# Altium PCB PCB_Sonography-v1.0.PcbDoc (part 3 of 3)
Units mil, origin at the board's own origin, x right, y up, seen from the top; angles counter-clockwise.
Board outline 1550.13 x 1118 mil, 4 copper layers (Top Layer, GND/Signal, PWR/Signal, Bottom Layer), stack 62.449 mil thick; 109 components, 55 nets, 355 pads, 157 vias.
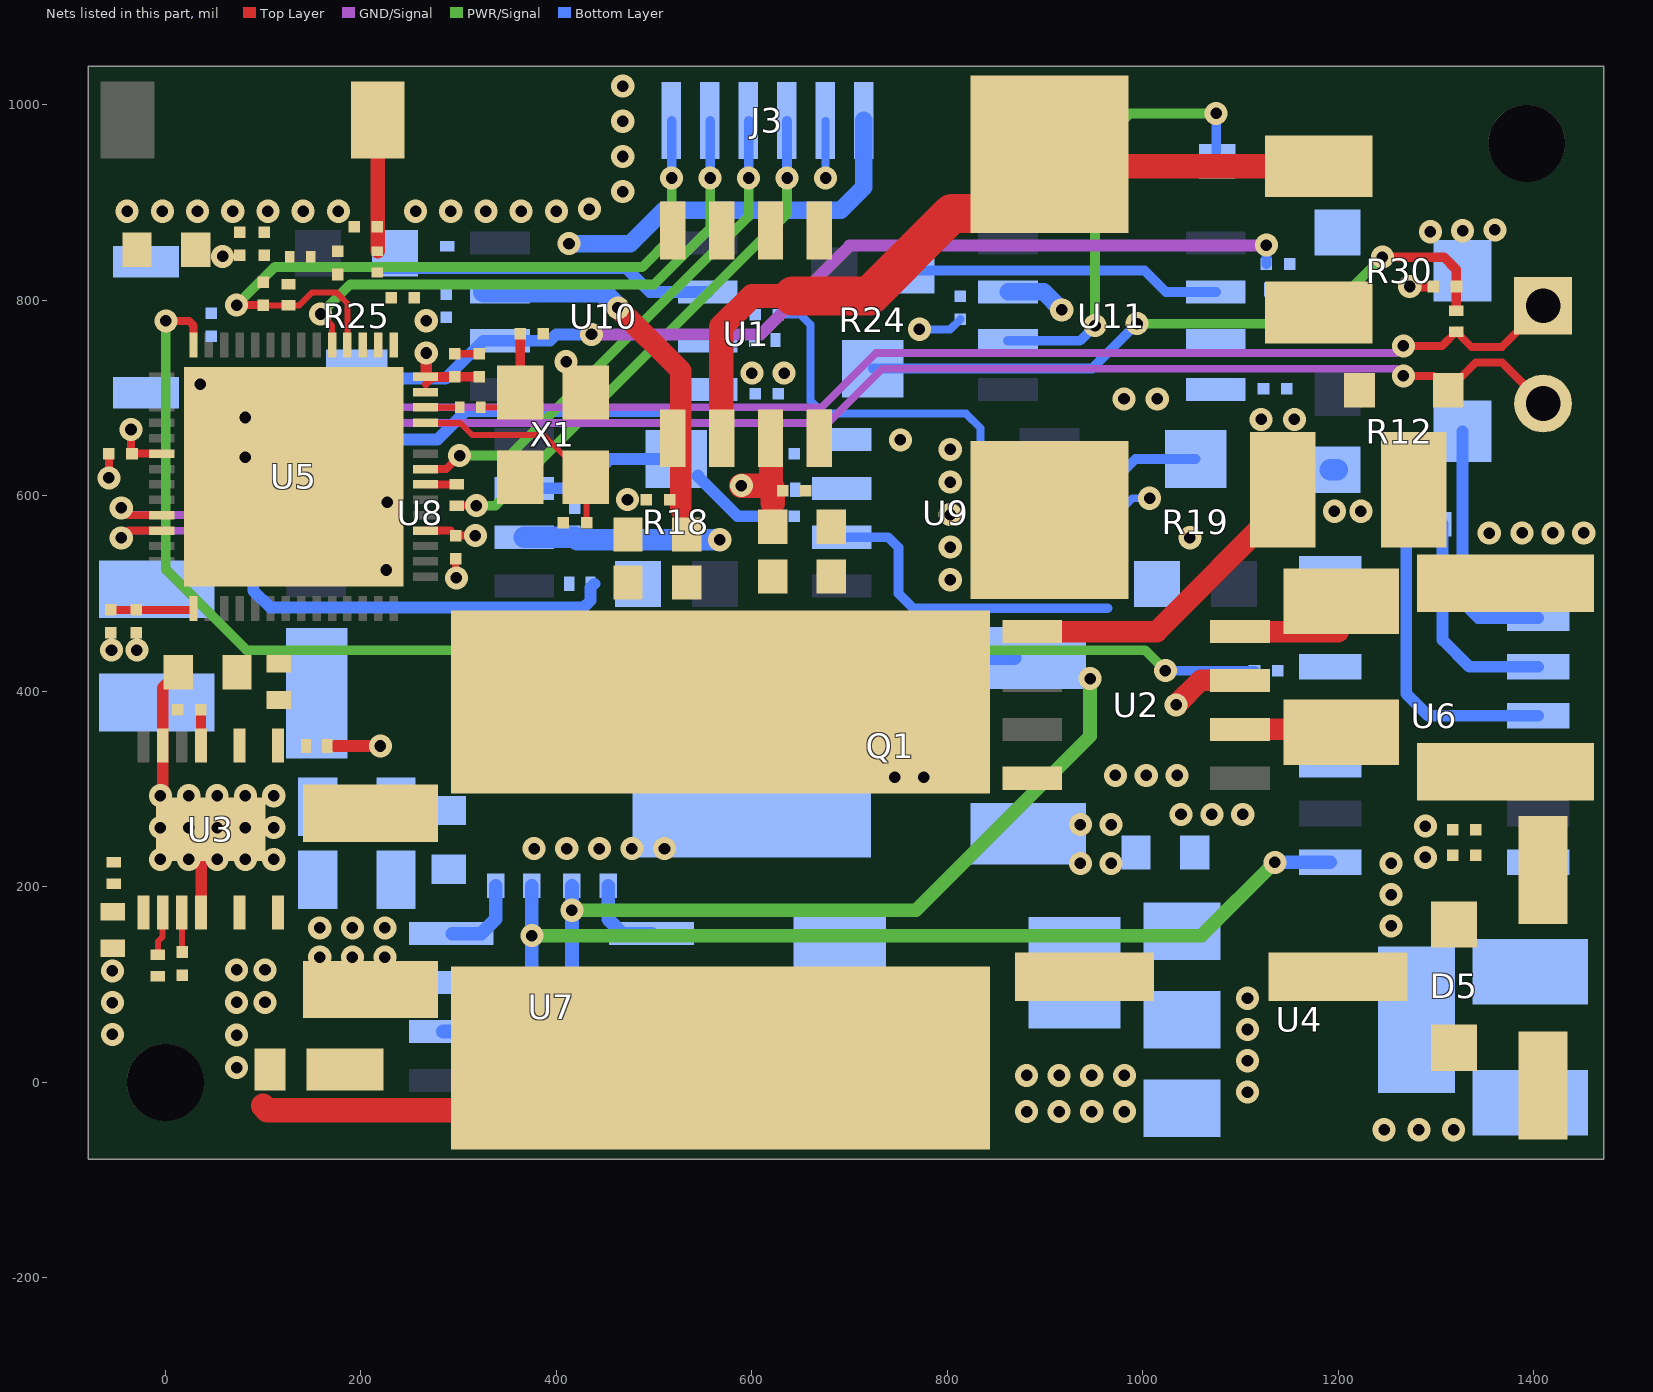
[diagram p4: the nets of this part, all layers, seen from the top]

## Part data (continued)
SW2: "SWITCH TACTILE SPST-NO 0.05A 12V", Contact Current Rating=50mA, Contact Resistance=100mR, Insulation Resistance=100MR, LCSC Part Number=C231329, Manufacturer=Omron, Max Operating Temperature=70°C, Max Voltage Rating (DC)=12V, Min Operating Temperature=-25°C, Operating Force=1.5N, Package Quantity=1, Ratings="Dust Proof,IP40", Supplier Part Number 1=SW1020DKR-ND, Actuator Length=0.4mm, Actuator Type=Standard, ComponentLink1Description=http://www.farnell.com/datasheets/60838.pdf?src-supplier=Farnell, ComponentLink1URL=http://www.farnell.com/datasheets/60838.pdf?src-supplier=Farnell, ComponentLink2Description=http://www.farnell.com/datasheets/60838.pdf?src-supplier=Element14, ComponentLink2URL=http://www.farnell.com/datasheets/60838.pdf?src-supplier=Element14, ComponentLink3Description=https://omronfs.omron.com/en_US/ecb/products/pdf/en-b3u.pdf?src-supplier=Digi-Key, ComponentLink3URL=https://omronfs.omron.com/en_US/ecb/products/pdf/en-b3u.pdf?src-supplier=Digi-Key, ComponentLink4Description=http://www.omron.com/ecb/products/pdf/en-b3u.pdf?src-supplier=Digi-Key, ComponentLink4URL=http://www.omron.com/ecb/products/pdf/en-b3u.pdf?src-supplier=Digi-Key, ComponentLink5Description=https://www.distrelec.biz/Web/Downloads/he/et/B3U_eng_datasheet.pdf?mime=application%2Fpdf&src-supplier=Distrelec, ComponentLink5URL=https://www.distrelec.biz/Web/Downloads/he/et/B3U_eng_datasheet.pdf?mime=application%2Fpdf&src-supplier=Distrelec, ComponentLink6Description=http://www.onlinecomponents.com/productFiles/mf-OM/en-b3u.pdf?src-supplier=Onlinecomponents.com, ComponentLink6URL=http://www.onlinecomponents.com/productFiles/mf-OM/en-b3u.pdf?src-supplier=Onlinecomponents.com, ComponentLink7Description=https://www.verical.com/server-webapp/html/getDatasheet?partID=552554&src-supplier=Verical, ComponentLink7URL=https://www.verical.com/server-webapp/html/getDatasheet?partID=552554&src-supplier=Verical, ComponentLink8Description=http://www.farnell.com/datasheets/1685550.pdf?src-supplier=Element14, ComponentLink8URL=http://www.farnell.com/datasheets/1685550.pdf?src-supplier=Element14, ComponentLink9Description=http://www.farnell.com/datasheets/2610940.pdf?src-supplier=Farnell, ComponentLink9URL=http://www.farnell.com/datasheets/2610940.pdf?src-supplier=Farnell, ComponentLink10Description=https://www.alliedelec.com/m/d/4c8a9ef82804fc3c241a13c1e298fd73.pdf?src-supplier=Allied+Electronics, ComponentLink10URL=https://www.alliedelec.com/m/d/4c8a9ef82804fc3c241a13c1e298fd73.pdf?src-supplier=Allied+Electronics, Contact Material=Silver, Current Rating=50mA, Depth=2.5mm, Electrical Life=200000Cycles, Height=1.2mm, Illumination Type=Non-Illuminated,Illuminated, Item Type=Switch, Lead Free="Lead Free", Length=4mm, Manufacturer Part Number=B3U-1000P, Max Current Rating=50mA, Mechanical Life=200000Cycles, Mount="Surface Mount", Orientation=Straight, Packaging="Tape and Reel", Pricing 1="1=1, 10=0.961, 25=0.9064, 50=0.7976, 100=0.7251, 250=0.68888, 500=0.67074, 1000=0.52571 (USD)", REACH SVHC=Unknown, Stock 1=116454, Supplier 1=Digi-Key, Switch Function=Off-Mom, Switch Travel=0.15mm, Termination=SMD/SMT, Throw Configuration=SPST, Voltage Rating (DC)=12V, Weight=0.000776oz, Width=3mm
U1: "IC REG BUCK 3.3V 2A 8SOIC", LCSC Part no=C151823, Manufacturer=Diodes, Supplier Part Number=AP1509-33SGDICT-ND, Category="Voltage Regulators - Switching", ComponentLink1Description=https://datasheet.ciiva.com/2024/ap1509-2024112.pdf?src-supplier=Digi-Key, ComponentLink1URL=https://datasheet.ciiva.com/2024/ap1509-2024112.pdf?src-supplier=Digi-Key, ComponentLink2Description=https://datasheet.ciiva.com/22696/608784-22696879.pdf?src-supplier=Element14, ComponentLink2URL=https://datasheet.ciiva.com/22696/608784-22696879.pdf?src-supplier=Element14, ComponentLink3Description=https://datasheet.ciiva.com/3220/ap1509-3220415.pdf?src-supplier=Avnet, ComponentLink3URL=https://datasheet.ciiva.com/3220/ap1509-3220415.pdf?src-supplier=Avnet, ComponentLink4Description=https://datasheet.ciiva.com/3222/ap1509-3222047.pdf?src-supplier=Avnet, ComponentLink4URL=https://datasheet.ciiva.com/3222/ap1509-3222047.pdf?src-supplier=Avnet, ComponentLink5Description=https://datasheet.ciiva.com/1161/608784-1161659.pdf?src-supplier=Element14, ComponentLink5URL=https://datasheet.ciiva.com/1161/608784-1161659.pdf?src-supplier=Element14, Item Type=Regulator, Manufacturer Part Number=AP1509-33SG-13, Pricing="1=1.6, 10=1.43, 25=1.3576, 100=1.115, 250=1.04232, 500=0.92112, 1000=0.7272 (USD)", RoHS=Yes, Stock=7160, Supplier=Digi-Key
U2: "Charge Pump INV/STPUP/STPDN -1.5V to -10V 100mA 8-Pin SOIC T/R / IC REG SWITCHD CAP INV 8SOIC", LCSC Part Number=C130206, Manufacturer="Texas Instruments", Supplier Part Number=296-21856-1-ND, Category="Voltage Regulators - Switching", ComponentLink1Description=https://datasheet.ciiva.com/15114/getdatasheetpartid-314156-15114111.pdf?src-supplier=Verical, ComponentLink1URL=https://datasheet.ciiva.com/15114/getdatasheetpartid-314156-15114111.pdf?src-supplier=Verical, ComponentLink2Description=https://datasheet.ciiva.com/2033/tl7660-2033856.pdf?src-supplier=Digi-Key, ComponentLink2URL=https://datasheet.ciiva.com/2033/tl7660-2033856.pdf?src-supplier=Digi-Key, ComponentLink3Description=https://datasheet.ciiva.com/41462/001014582-da-01-en-ic-reg-multi-config-tl7660cdr-soic-8-tid-41462430.pdf?src-supplier=Conrad, ComponentLink3URL=https://datasheet.ciiva.com/41462/001014582-da-01-en-ic-reg-multi-config-tl7660cdr-soic-8-tid-41462430.pdf?src-supplier=Conrad, ComponentLink4Description=https://datasheet.ciiva.com/3216/tl7660-3216343.pdf?src-supplier=Avnet, ComponentLink4URL=https://datasheet.ciiva.com/3216/tl7660-3216343.pdf?src-supplier=Avnet, ComponentLink5Description=https://datasheet.ciiva.com/2033/tl7660-2033857.pdf?src-supplier=Digi-Key, ComponentLink5URL=https://datasheet.ciiva.com/2033/tl7660-2033857.pdf?src-supplier=Digi-Key, ComponentLink6Description=https://datasheet.ciiva.com/2033/tl7660-2033858.pdf?src-supplier=Digi-Key, ComponentLink6URL=https://datasheet.ciiva.com/2033/tl7660-2033858.pdf?src-supplier=Digi-Key, Item Type=IC, Manufacturer Part Number=TL7660CDR, Pricing="1=1.15, 10=1.024, 25=0.9716, 100=0.798, 250=0.746, 500=0.65926, 1000=0.52046 (USD)", RoHS=Yes, Stock=5011, Supplier=Digi-Key
U3: "IC REG MULTI CONFG ADJ 16MSOP", LCSC Part Number=C673751, Manufacturer="Analog Devices", Package=MSOP-12, ComponentLink1Description=LCSC, ComponentLink1URL=https://www.lcsc.com/product-detail/DC-DC-Converters_Analog-Devices-LT8331IMSE-TRPBF_C673751.html, Item Type=IC, Manufacturer Part Number=LT8331IMSE#TRPBF
U4: "SOT-223 Linear Voltage Regulators (LDO) ROHS", LCSC Part Number=C5181462, Manufacturer=HX(hengjiaxing), Package=SOT-223, ComponentLink1Description=LCSC, ComponentLink1URL=https://www.lcsc.com/product-detail/Linear-Voltage-Regulators-LDO_HX-hengjiaxing-AMS1117-5-0_C5181462.html, Item Type=IC, Manufacturer Part Number=AMS1117-5.0
U5: "21dBm ESP32-S3R8 2.4GHz SMD WiFi Modules ROHS", LCSC Part Number=C3013940, Manufacturer="Espressif Systems", Supplier Part Number=356-ESP32-S3FH4R2, ComponentLink1Description=LCSC, ComponentLink1URL=https://www.lcsc.com/product-detail/WiFi-Modules_Espressif-Systems-ESP32-S3FH4R2_C3013940.html, Item Type=IC, Manufacturer Part Number=ESP32-S3FH4R2, Pricing="1=2.32, 10=2.32, 50=2.32, 100=2.32, 1000=2.32, 10000=2.32 (USD)", RoHS=No, Stock=2650, Supplier=Mouser
U6: "45ns 4.75V~5.25V SOIC-14 Monostable Multivibrators ROHS", LCSC Part Number=C1522774, Manufacturer="Taxes Instrument", Package=SOIC-14, ComponentLink1Description=LCSC, ComponentLink1URL=https://www.lcsc.com/product-detail/Monostable-Multivibrators_Texas-Instruments-SN74121D_C1522774.html, Item Type=IC, Manufacturer Part Number=SN74121D
U7: "MOSFET 4.5V~15V SOIC-8 Gate Drive ICs ROHS", LCSC Part Number=C1549286, Manufacturer=RENESAS, Package=SOIC-8, ComponentLink1Description=LCSC, ComponentLink1URL=https://www.lcsc.com/product-detail/Gate-Drive-ICs_RENESAS-ICL7667CBAZA_C1549286.html, Item Type=IC, Manufacturer Part Number=ICL7667CBAZA
U8 U9 U10: "Video Amplifier, 1, 140 Mhz, 2500 V/ S, 0 C, 70 C, 100 Ma Rohs Compliant: Yes", Manufacturer="Analog Devices", Supplier Part Number=584-AD811JRZ, Category="Amplifiers - Op Amps, Buffer, Instrumentation", ComponentLink1Description=https://datasheet.ciiva.com/1134/1610772-1134928.pdf?src-supplier=Element14, ComponentLink1URL=https://datasheet.ciiva.com/1134/1610772-1134928.pdf?src-supplier=Element14, ComponentLink2Description=https://datasheet.ciiva.com/15130/getdatasheetpartid-72911-15130233.pdf?src-supplier=Verical, ComponentLink2URL=https://datasheet.ciiva.com/15130/getdatasheetpartid-72911-15130233.pdf?src-supplier=Verical, ComponentLink3Description=https://datasheet.ciiva.com/1823/ad811-1823927.pdf?src-supplier=Digi-Key, ComponentLink3URL=https://datasheet.ciiva.com/1823/ad811-1823927.pdf?src-supplier=Digi-Key, ComponentLink4Description=https://datasheet.ciiva.com/2972/ad811-2972994.pdf?src-supplier=Avnet, ComponentLink4URL=https://datasheet.ciiva.com/2972/ad811-2972994.pdf?src-supplier=Avnet, Item Type=IC, Manufacturer Part Number=AD811JRZ, Pricing="1=12.99, 10=11.94, 25=11.45, 50=11.45, 98=10.09, 100=10.09, 1000=8.97, 10000=8.97 (USD)", RoHS=Yes, Stock=196, Supplier=Mouser
U11: "Very High Speed, High Output Current, Voltage Feedback Amplifier 8-SOIC -40 to 85", Manufacturer="TI National Semiconductor", Supplier Part Number=926-LM7171AIMX/NOPB, Category="Amplifiers - Op Amps, Buffer, Instrumentation", ComponentLink1Description=https://datasheet.ciiva.com/6627/lm7171-6627136.pdf?src-supplier=Digi-Key, ComponentLink1URL=https://datasheet.ciiva.com/6627/lm7171-6627136.pdf?src-supplier=Digi-Key, ComponentLink2Description=https://datasheet.ciiva.com/6627/lm7171-6627103.pdf?src-supplier=Digi-Key, ComponentLink2URL=https://datasheet.ciiva.com/6627/lm7171-6627103.pdf?src-supplier=Digi-Key, Item Type=IC, Manufacturer Part Number=LM7171AIMX/NOPB, Pricing="1=4.79, 10=4.22, 50=4.22, 100=3.58, 1000=2.61, 10000=2.51 (USD)", RoHS=Yes, Stock=853, Supplier=Mouser
X1: library part X322540MPB4SI, "40MHz SMD Crystal Resonator 15pF SMD3225-4P Crystals ROHS", LCSC Part Number=C9010, Manufacturer="Yangxing Tech", ComponentLink1Description=LCSC, ComponentLink1URL=https://www.lcsc.com/product-detail/Crystals_Yangxing-Tech-X322540MPB4SI_C9010.html, Item Type=Crystal, Manufacturer Part Number=X322540MPB4SI

## Free pads (board coordinates)
  round 78.74 hole 78.74 unplated: MH(0,0) MH(1392.65,960.52)

## Via types
v1: diameter 23.62, hole 11.81, Top Layer to Bottom Layer, tented both sides, 115 vias
v2: diameter 23.62, hole 11.81, Top Layer to Bottom Layer, 42 vias

## Nets (pads, with @x,y where several pads share a name; then routed paths per layer and width w, separated by ;. In a path a pad name is that pad's centre, name@x,y a point inside that pad or via, vN(x,y) a via of type N, cw(c..) or ccw(c..) an arc to the next point about the centre after c; other vN are vias at no path point)
3V3: C3.2 C4.2 C5.2 C17.2 C18.2 C19.2 C22.2 C23.2 C24.2 C30.2 J3.1 L1.2 L5.1 R11.2 U1.3 U5.20 U5.46 U5.55 U5.56 | length 679.8
  Top Layer w8: C30.2@-35,643 v1@-35,667 ; C30.2@-31.95,643.05 U5.20@-3.59,643.05 ; U5.46@266.1,564.31 291.96,564.31 C17.2@297.1,559.17 v1(317.28,559.1) ; U5.56@266.1,721.79 U5.56@267,721.79 ; 266.5,714 270.64,718.14 U5.56@274.05,721.55 ; C18.2@320.86,721.79 C18.2@321.1,721.55
  Top Layer w10: U5.56@274.05,721.55 C19.2@296.1,721.55 ; C19.2@296.1,721.79 C18.2@320.86,721.79
  Top Layer w12: U5.56@267,721.79 v1(267,746)
  Top Layer w25: v1(589.24,610.24) 619.52,610.24 619.58,610.18 ; U1.3@619.58,658.67 619.58,610.18 ; 621.5,592.5 621.5,608.26 619.58,610.18
  Bottom Layer w18: v1(413,857.81) 475.81,857.81 510,892 691,892 714.37,915.37 J3.1@714.37,984
  other v1: 803,514 803,547.33 803,580.67 803,614 803,647.34 -35.03,667.73 58.57,844.78
5V: C14.1 R12.1 U4.2 U4.4 U6.14 | length 7.5
  Bottom Layer w22: R12.1@1191.52,626.63 R12.1@1199.02,626.63
  other v1: 1107,-10 1107,22 1107,54 1107,86 1254,160 1254,192 1254,224 1195.81,584.13 1223,584.13
100V: C12.2 C33.2 C34.1 D2.1 R4.2 R13.2 | length 0.4
  Top Layer w14: R4.2@-54,137.26 R4.2@-53.61,137.26
  other v1: 191.33,158
  other v2: 881,-30 914.33,-30 947.67,-30 981,-30 881,7 914.33,7 947.67,7 981,7 -54,49 -54,81.5 -54,114 158,128 191.33,128 224.67,128 158,158 224.67,158
+9V: C6.2 C7.2 C8.2 C11.1 C15.2 C36.1 C37.2 C40.2 C42.2 C46.2 C48.2 F1.2 L2.2 R2.1 U1.1 U2.8 U3.3 U4.3 U7.6 U8.7 U9.7 U10.7 U11.7 | length 644.4
  Top Layer w10: C11.1@73.39,419.5 C11.1@76.05,416.84
  Top Layer w22: v1(463,792.19) 527.5,727.69 527.5,658.67 527.5,586
  Bottom Layer w18: U11.7@862.09,808.47 898.53,808.47 v1(917,790)
  Bottom Layer w22: U10.7@325.7,808.5 446.69,808.5 v1(463,792.19) ; U8.7@367.19,557.55 418.9,557.55 421.48,554.97 v1(567.22,554.97)
  other v1: 1039,274 1070.57,274 1102.13,274.1 746,312 776,312 971.87,314 1003.43,314 1035,314 1048,557 1354.3,561.79 1387.87,561.9 1419.43,561.9 1451,562
-9V: C9.2 C41.2 C43.2 C47.2 C49.2 U2.5 U8.4 U9.4 U10.4 U11.4 | length 722.3
  Top Layer w22: U2.5@886.7,461 1014,461 1143.14,590.14 C9.2@1143.14,613
  Bottom Layer w12: U8.4@154.6,657.55 278.55,657.55 307.7,686.7 307.73,686.66 532,686.66
  other v1: 751.88,657.02 1121,678 1155,678 980.7,699 1014.7,699 600.06,725.34
EN: C28.2 C29.2 J3.6 R11.1 SW2.2 U5.4 | length 768.2
  Top Layer w6: 91.37,794.72 R11.1@126.1,794.72 137.01,794.72 149.97,807.68 175.32,807.68 179,804 186.37,796.63 U5.4@186.37,754.27
  Top Layer w8: v1(73,795) C29.2@100.1,795
  PWR/Signal w10: v1(73,795) 112,834 488,834 518,864 v1(518,925)
  Bottom Layer w8: J3.6@517.52,984 J3.6@518,983.52
  Bottom Layer w10: v1(518,925) J3.6@518,983.52
GND: C1.1 C2.1 C3.1 C4.1 C5.1 C6.1 C7.1 C8.1 C9.1 C11.2 C12.1 C13.2 C14.2 C15.1 C16.2 C17.1 C18.1 C19.1 C20.1 C21.1 C22.1 C23.1 C24.1 C25.1 C26.1 C27.1 C28.1 C29.1 C30.1 C31.1 C32.1 C33.1 C34.2 C36.2 C37.1 C40.1 C41.1 C42.1 C43.1 C46.1 C47.1 C48.1 C49.1 C52.1 D1.2 D4.2 D5.2 J1.2 J3.2 Q1.3 R3.1 R5.2 R6.2 R14.1 R17.1 R20.1 R21.1 R22.1 R23.1 R27.1 R28.1 R30.2 SW2.1 U1.4 U1.5 U1.6 U1.7 U1.8 U2.3 U3.7 U3.12 U3.17 U4.1 U5.57 U6.3 U6.4 U6.7 U7.3 U11.3 X1.2 X1.4 | length 612.3
  Top Layer w8: v1@-57.62,619 C30.1@-57.62,643 ; C19.1@296.1,745.17 C18.1@321.1,745.17 ; C17.1@297.1,535.55 297.1,517.1 296,516 v1(297.7,516) ; X1.4@415,705.55 X1.4@430.03,705.55
  Top Layer w10: v1@1273,814 C52.1@1297.19,814
  Top Layer w12: U3.17@3,276 -2.69,281.69 U3.7@-2.69,344.38 -2.69,403.42 C11.2@13.39,419.5 ; U3.17@26,241.93 27.21,241.93 36.68,232.46 U3.12@36.68,173.55 ; 174,344 v1(220,344)
  Top Layer w22: v1(1034,386) 1059,411 U2.3@1099.3,411
  Bottom Layer w8: v1(675.48,925) J3.2@675.48,983.52 ; v1@771.97,769.97 802.72,769.97 C48.1@813.39,780.64 ; C42.1@961.9,584.26 976.26,584.26 989.41,597.41 v1(1006.81,597.41)
  other v1: 1246.73,-48.54 1282.3,-48.54 1317.87,-48.54 936,224 967.57,224 1289,230 1289,262 936,263.54 967.57,263.54 -55,442 -29,442 226,524 226.94,593.45 472.81,596 -57.59,618.27 81.71,639.39 82,680 35.83,714.17 633,725.34 410,737 771.31,770.31 267,779 1273,814 1294,870 1327,871 1360,872 -39,891 -3,891 33,891 69,891 105,891 141,891 177,891 256,891 292,891 328,891 364,891 400,891 433.92,893.08 468,911 468,947 468,983 468,1019
  other v2: -5,227.93 24,227.93 53,227.93 82,227.93 111,227.93 -5,260.5 24,260.5 53,260.5 82,260.5 111,260.5 -5,293.07 24,293.07 53,293.07 82,293.07 111,293.07
IO0: J3.5 U5.5 | length 581.2
  Top Layer w6: v1(159,785.87) 170.63,774.25 U5.5@170.63,754.27
  PWR/Signal w10: v1(159,785.87) 189.13,816 500,816 557.37,873.37 v1(557.37,925)
  Bottom Layer w10: v1(557.37,925) J3.5@557.37,983.52
L_OUT: D2.2 L2.1 U3.14 U3.16 | length 492
  Top Layer w25: 100,-24 104.5,-28.5 514.59,-28.5 L2.1@568,24.91
  other v2: 73,15 73,48.33 73,81.67 102,81.67 73,115 102,115
NetANT1_1: Ant1.1 C20.2 L3.1 | length 133.9
  Top Layer w15: L3.1@217.34,850 C20.2@217.34,875 ; C20.2@217.34,875.34 Ant1.1@217.34,984.26
NetC1_2: C1.2 C2.2 D5.1 F1.1 J1.1
NetC10_1: C10.1 U2.2 | length 104.9
  Top Layer w22: U2.2@1099.3,361 C10.1@1200.07,361
  Top Layer w25: C10.1@1200.07,361 C10.1@1203,358.07
NetC10_2: C10.2 U2.4 | length 100.8
  Top Layer w22: U2.4@1099.3,461 C10.2@1200.07,461
NetC13_1: C13.1 U3.5 | length 36.9
  Top Layer w10: U3.5@36.68,344.38 C13.1@36.68,381.26
NetC16_1: C16.1 U3.11 | length 40.5
  Top Layer w6: U3.11@16.99,173.55 16.99,133.66 C16.1@17.39,133.26
NetC21_2: C21.2 L3.2 U5.1
NetC25_2: C25.2 L5.2 U5.2 U5.3
NetC26_2: C26.2 C27.2 U5.29 | length 85.1
  Top Layer w6: U5.29@27.57,483.26 U5.29@28.89,484.58
  Top Layer w8: C26.2@-55.61,483.26 U5.29@27.57,483.26
NetC35_1: C35.1 J4.1 R14.2
NetC35_2: C35.2 Q1.2 R13.1
  other v2: 377.33,239 410.67,239 444,239 477.33,239 510.67,239
NetC38_1: C38.1 U6.11 | length 317.6
  Bottom Layer w12: C38.1@1269.5,571 1269.5,397.5 1292,375 U6.11@1404.3,375
NetC38_2: C38.2 U6.10 | length 227.7
  Bottom Layer w12: C38.2@1306.5,571 1306.5,452.5 1334,425 U6.10@1404.3,425
NetC39_1: C39.1 U6.5
NetC44_2: C44.2 R22.2 U8.3
NetC45_2: C45.2 R23.2 U9.3
NetC50_2: C50.2 R26.1
NetC51_2: C51.2 R28.2 U10.3
NetD1_1: D1.1 L1.1 U1.2 | length 803.7
  Top Layer w25: U1.2@569.09,658.67 568.75,659.01 568.75,772.75 600.26,804.26 642,804.26 ; L1.1@904.39,949.27 916.66,937 D1.1@1180,937
  Top Layer w40: 642,804.26 720.26,804.26 804.56,888.56 843.68,888.56 L1.1@904.39,949.27
NetD3_1: D3.1 U11.6 | length 464.7
  PWR/Signal w10: v1(951,774) 951,955 987,991 v1(1075,991)
  Bottom Layer w10: U11.6@862.09,758.47 935.47,758.47 v1(951,774) ; v1(1075,991) 1075,942.98 D3.1@1075.98,942
NetL4_1: L4.1 U5.54 | length 35.1
  Top Layer w6: U5.54@266.1,690.29 300.84,690.29 L4.1@301.1,690.55
NetQ1_1: Q1.1 R16.2 R17.2 U7.7 | length 995.4
  PWR/Signal w14: v1(416,176) 768,176 946,354 v1(946,413)
  Bottom Layer w14: R16.2@416,201 v1(416,176) 416,63 427,52 U7.7@497.43,52 498.43,51 R17.2@577,51 ; Q1.1@839.96,433.96 Q1.1@868.68,433.96
NetR2_2: R2.2 R3.2 U3.1
NetR4_1: R4.1 R5.1 U3.9
NetR6_1: R6.1 U3.10 | length 45.3
  Top Layer w6: R6.1@-7.61,130.26 -7.61,144.04 -2.69,148.96 U3.10@-2.69,173.55
NetR8_1: R8.1 U5.49 | length 32
  Top Layer w8: U5.49@266.1,611.55 R8.1@298.1,611.55
NetR12_2: R12.2 U6.9 | length 258.9
  Bottom Layer w12: R12.2@1326.98,666 1326.98,491.02 1343,475 U6.9@1404.3,475
NetR15_2: R15.2 U7.4 | length 84.6
  Bottom Layer w14: U7.4@293.58,152 323,152 338,167 R15.2@338,201
NetR16_1: R16.1 U7.5 | length 84.6
  Bottom Layer w14: R16.1@453,201 453,167 468,152 U7.5@497.43,152
NetR18_3: R18.3 R20.2 U8.2 | length 484
  Bottom Layer w12: U8.2@154.6,557.55 105.55,557.55 90,542 90,503 107.26,485.74 427.97,485.74 435,492.77 435,506 R20.2@439,510
NetR19_3: R19.3 R21.2 U9.2 | length 329.7
  Bottom Layer w10: U9.2@691.9,557.55 739.45,557.55 750,547 750,500 765,485 964,485
NetR24_3: R24.3 R26.2 U11.2 | length 320.6
  Bottom Layer w10: R24.3@763.13,830.39 1001.61,830.39 1023.53,808.47 U11.2@1074.69,808.47
NetR25_3: R25.3 R27.2 U10.2 | length 346.1
  Bottom Layer w12: R25.3@219,833 288.4,833 471,833 495.53,808.47 U10.2@554.98,808.47
O/P_1: C45.1 R18.2 U8.6 | length 267.3
  Bottom Layer w12: U8.6@367.19,607.55 424.55,607.55 454.5,637.5 R18.2@522.9,637.5 R18.2@528.86,637.5 ; R18.2@545,621 545,619.4 585.4,579 C45.1@619.89,579
O/P_2: C51.1 R19.2 U9.6 | length 587.7
  Bottom Layer w8: C51.1@627.21,785.26 649.74,785.26 660,775 660,697 673,684 819,684 834,669 834,619 845.45,607.55 U9.6@904.5,607.55
  Bottom Layer w10: U9.6@904.5,607.55 962.55,607.55 992.5,637.5 R19.2@1053.87,637.5
O/P_3: C50.1 R25.2 U10.6 | length 1007.2
  GND/Signal w12: v1(436,765) 609.14,765 699.99,855.85 v1@1126.86,855.85
  Bottom Layer w10: C50.1@1126.39,837 1126.39,855.38 v1@1127.33,856.32
  Bottom Layer w12: R25.2@195.68,720 286.73,720 325.21,758.47 U10.6@342.39,758.47 393.47,758.47 400,765 v1(436,765)
  other v1: 1126.33,856.32
O/P_4: C52.2 D3.2 R24.2 R29.2 R30.3 | length 691.3
  Top Layer w10: v1(1245,844) 1308,844 1320.54,831.46 R29.2@1320.54,789.39
  PWR/Signal w10: v1(994,776) 1177,776 v1(1245,844)
  Bottom Layer w10: R24.2@723.76,730 948,730 v1(994,776)
Q': R15.1 U6.1 U7.2 | length 1081
  PWR/Signal w14: v1(375,150) 1060,150 v1(1135,225)
  Bottom Layer w14: U7.2@283.7,52 363,52 375,64 v1(375,150) R15.1@375,201 ; v1(1135,225) U6.1@1191.7,225
RX_IN: C44.1 J6.1
RX_OUT_N: J5.1 R29.1 U5.24 | length 1603.4
  Top Layer w8: v1(-45,587.49) -37.56,580.05 U5.24@-3.59,580.05 ; v1(1266.5,753.18) 1305.98,753.18 R29.1@1320.54,767.74 1336.02,752.26 1367.39,752.26 J5.1@1409.39,794.26
  GND/Signal w8: v1(-45,587.49) -37.69,580.18 -2.5,580.18 42.9,580.18 59,580.18 169.36,690.54 671.54,690.54 726.87,745.87 1259.19,745.87 v1(1266.5,753.18)
RX_OUT_P: D4.1 J5.2 U5.25 | length 1608.7
  Top Layer w8: v1(-45,556.87) -37.56,564.31 U5.25@-3.59,564.31 ; v1(1266.5,722.56) 1297.71,722.56 D4.1@1312.27,708 1340.53,736.26 1367.39,736.26 J5.2@1409.39,694.26
  GND/Signal w8: v1(-45,556.87) -37.69,564.18 65.63,564.18 175.99,674.54 309,674.54 331.52,674.54 678.17,674.54 733.5,729.87 1259.19,729.87 v1(1266.5,722.56)
RXD: J3.4 U5.50 | length 535.5
  Top Layer w8: U5.50@266.1,627.3 287.3,627.3 v1(301,641)
  PWR/Signal w10: v1(301,641) 352,641 596.74,885.74 v1(596.74,925)
  Bottom Layer w10: v1(596.74,925) J3.4@596.74,983.52
Trigger_IN: C39.2 U5.14 | length 1460.9
  Top Layer w8: v1(0.6,778.86) 24.21,778.86 28.89,774.17 U5.14@28.89,754.27
  PWR/Signal w10: v1(0.6,778.86) 0.6,524.4 83,442 1002.05,442 v1(1022.95,421.1)
  Bottom Layer w10: v1@1023.05,421 C39.2@1114.19,421
TXD: J3.3 R8.2 | length 557
  Top Layer w8: R8.2@298.1,589.9 v1(318.28,589.83) v1(318.28,589.83)
  PWR/Signal w10: v1(318.28,589.83) 337.83,589.83 636.11,888.11 v1(636.11,925)
  Bottom Layer w10: v1(636.11,925) J3.3@636.11,983.52
XTAL_IN: C31.2 L4.2 X1.1 | length 97.3
  Top Layer w6: L4.2@322.75,690.55 X1.1@365.1,690.55
  Top Layer w10: X1.1@363.1,710.55 C31.2@363.1,765.55
XTAL_OUT: C32.2 U5.53 X1.3 | length 233.7
  Top Layer w6: U5.53@266.1,674.54 301.46,674.54 314,662 386.96,662 430.91,618.05 C32.2@430.91,572.55
pads on no net: Ant1.2 R12.3 R18.1 R19.1 R24.1 R25.1 R30.1 U2.1 U2.6 U2.7 U3.6 U3.8 U5.6 U5.7 U5.8 U5.9 U5.10 U5.11 U5.12 U5.13 U5.15 U5.16 U5.17 U5.18 U5.19 U5.21 U5.22 U5.23 U5.26 U5.27 U5.28 U5.30 U5.31 U5.32 U5.33 U5.34 U5.35 U5.36 U5.37 U5.38 U5.39 U5.40 U5.41 U5.42 U5.43 U5.44 U5.45 U5.47 U5.48 U5.51 U5.52 U6.2 U6.6 U6.8 U6.12 U6.13 U7.1 U7.8 U8.1 U8.5 U8.8 U9.1 U9.5 U9.8 U10.1 U10.5 U10.8 U11.1 U11.5 U11.8

## Polygon pours and split planes (outlines as drawn)
GND on Top Layer "GND_L01_P019" (solid, remove dead copper, pour order 19): -78.74,-78.74 -78.74,1039.26 1471.39,1039.26 1471.39,-78.74
3V3 on Top Layer "3V3_L01_P002" (solid, remove dead copper, pour order 2): 14,834 116.1,834 116.1,808 135,808 135,856 52,856 52,872.55 14,872.55
+9V on Top Layer "+9V_L01_P011" (solid, remove dead copper, pour order 11): 1464,585 1464,480 1279,480 1279,547 1333,547 1333,585
NetC25_2 on Top Layer "NETC25_2_L01_P003" (solid, remove dead copper, pour order 3): 185,835 208,812 208,771 222,771 222,741 198,741 198,799 177.93,819.07 144,819.07 144,856 162,856 162,835
NetC1_2 on Top Layer "NETC1_2_L01_P006" (solid, pour order 6): 1280,354 1280,286 1330,286 1330,211 1283,211 1283,128 1463,128 1463,354
GND on Bottom Layer "GND_L04_P014" (solid, remove dead copper, pour order 14): -78.74,-78.74 -78.74,1039.26 1471.39,1039.26 1471.39,-78.74
+9V on Bottom Layer "+9V_L04_P010" (solid, remove dead copper, pour order 10): 979,27.35 979,112 1114,112 1114,294 1027,294 1027,200 838,200 838,27.35
5V on Bottom Layer "5V_L04_P009" (solid, remove dead copper, pour order 9): 1138,99 1138,181 1239,181 1239,241 1460,241 1460,48 1325,48 1325,-22 1093,-22 1093,22.5 997,22.5 997,99
+9V on PWR/Signal "+9V_L03_P015" (solid, remove dead copper, pour order 15): -78.74,-78.74 -78.74,1039.26 1471.39,1039.26 1471.39,-78.74
3V3 on PWR/Signal "3V3_L03_P013" (solid, remove dead copper, pour order 13): 579.39,623 775,623 775,666 837,666 837,459 -73,459 -73,873 268,873 268,872.19 268.81,873 435,873 435,853 428.24,846.24 362,846.24 362,538.26 579.39,538.26
5V on PWR/Signal "5V_L03_P012" (solid, remove dead copper, pour order 12): 1271,106 1152,106 1152,-26 1083,-26 1083,638 1271,636.88
-9V on PWR/Signal "-9V_L03_P008" (solid, remove dead copper, pour order 8): 1186,666 1186,753 584,753 584,623 775,623 775,666
100V on PWR/Signal "100V_L03_P007" (solid, remove dead copper, pour order 7): -68,184 -68,-68 1002,-68 1002,113 284,113 284,184
GND on GND/Signal "GND_L02_P020" (solid, remove dead copper, pour order 20): -78.74,-78.74 -78.74,1039.26 1471.39,1039.26 1471.39,-78.74

## Other copper
Top Layer:
  rectangle net NetD1_1: 774,869 991,1031
  rectangle net NetD1_1: 774,877 1235,971
  rectangle net GND: 160,331 233,356
  rectangle net 100V: -68,37 -39,148
  rectangle net GND: -16,225 282,308
  rectangle net 3V3: 253,702 280,726
  rectangle net GND: -8.69,372.26 22,437
  rectangle net +9V: 56,324 89,442
  rectangle net +9V: 56,418 316,460
  rectangle net NetR2_2: 103,327 150,401
  rectangle net +9V: 537,480 585,584
  rectangle net NetANT1_1: 209.84,842.17 224.84,861.17
  rectangle net NetC21_2: 208,823 239,834
  rectangle net -9V: 1109,554 1177,693
  rectangle net 3V3: 787,493 988,661
  rectangle net NetC10_2: 1139,449.26 1264,529
  rectangle net GND: 648.89,498.41 700,688
  rectangle net 3V3: 605,497 638,688
  rectangle net +9V: 506,480 549,692
  rectangle net +9V: 290,295 847,483
  rectangle net +9V: 290,295 1049,335
  rectangle net NetC21_2: 215,794 237,834
  rectangle net NetC21_2: 230,741 239,834
  rectangle net 100V: 863,-44 1012,134
  rectangle net 100V: 140,-9 281,173
  rectangle net L_OUT: 61,-66 845,-18
  rectangle net L_OUT: 56,-66 124,191
  rectangle net NetR4_1: -69,156 -16,210
  pour cut-out: 703,1034 703,494 1103,494 1103,1034
  pour cut-out: -78.61,908.26 -78.61,1039.26 450.39,1039.26 450.39,908.26
  pour cut-out: 282.91,487 851.09,487 851.09,-76.33 851.5,-76.74 284.5,-76.74 282.91,-76.74 282.91,-72.33
Bottom Layer:
  rectangle net NetR18_3: 429,486 483.53,517
  rectangle net NetC39_1: 1131.27,412 1225,441
  rectangle net -9V: 1101,662.05 1133.28,721
  rectangle net L_OUT: 59,2 118,132
  rectangle net EN: 21,779 37,858.26
  rectangle net +9V: 337,543 447,570
  rectangle net +9V: 804.39,796 893,818
  rectangle net RX_IN: -69,473 61,538
  rectangle net RX_IN: -15,473 61,619
  rectangle net NetC44_2: 73,595 186,620
  region net NetR19_3: 1038,510.39 954.9,510.39 954.9,480 1038,480
  rectangle net +9V: 872.82,543.08 1060,571.08
  rectangle net 5V: 1174,571 1235,652
  rectangle net O/P_4: 1175,832 1257,964
  rectangle net NetC51_2: 594.4,746 610,792
  rectangle net NetC51_2: 524,746 610,771
  rectangle net NetC50_2: 1144.2,801 1165,848
  rectangle net NetR24_3: 1043,794 1135,822
  rectangle net NetC45_2: 637,570 651.7,621
  rectangle net NetC45_2: 638,595 723,621
  rectangle net +9V: 278.4,797 373,820
  region net -9V: 1129.28,721.02 966,721.02 966,686 1129.28,686
  rectangle net -9V: 637.31,635 766.88,672
  region net -9V: 612,737 519,737 519,680.66 612,680.66
  rectangle net -9V: 100,646 185,672
  rectangle net NetQ1_1: 807,393 983,466
  rectangle net +9V: 731,192 788,325
  rectangle net +9V: 554,180 788,212
  rectangle net +9V: 554,90 573,208
  rectangle net +9V: 454,90 573,114
  rectangle net EN: 21,779 91.1,807
  rectangle net EN: -64.1,822 37,858.26
  rectangle net 100V: 212,150 237,185
  rectangle net 100V: 142,116 237,170
  rectangle net NetC35_2: 327,224 721,262
  rectangle net NetC35_2: 215,249 709,317
  rectangle net 100V: 212,175 310,238
  rectangle net NetC35_1: 133,249 188,342
  rectangle net NetC35_1: 102,332 188,466
  rectangle net NetC35_1: -69,332 188,421
  pour cut-out: -78.74,908.26 -78.74,1039.26 450.39,1039.26 450.39,908.26

## Silkscreen, mask and mechanical layers (free items; w line width, h text height)
Top Overlay:
  drawing of 11 lines, arcs and shapes, not listed
  text "100V" at 248.17,4.21 h20
Bottom Overlay:
  lines w3: 605,560 605,659 658,659 658,633 658,560 605,560
  lines w5: 39,658.74 73.11,658.74 ; 40,633 94,633 ; 97,317 124,310 ; 962.9,496.83 961,496.83 961,460 974,460 ; 1156,846 1156,870 ; -67,917 -67,1022 20,1022 20,917 -67,917
  text "@" at 60,995.53 h40
  text "EN" at 507,893.42 h35 r270
  text "TX" at 625.11,892.91 h35 r270
  text "RX" at 585.74,891 h35 r270
  text "IO0" at 546.78,885.37 h35 r270
  text "GND" at 664.89,865.7 h35 r270
  text "3V3" at 702.78,865.48 h35 r270
  text "@" at 627,542.71 h25
  text "RX" at 65.02,473.69 h50 r270
  text "TX" at 62.02,357.98 h50 r270
Dimension:
  circle w0.5: c911.65,556.83 r39.37
  lines w10: -77,448.26 1471.39,448.26
Board Outline:
  circle w10: c1392.65,960.52 r39.37
  lines w10: -78.74,-78.74 1471.39,-78.74 1471.39,1039.26 -78.74,1039.26 -78.74,-78.74
Fabrication:
  drawing of 295 lines, arcs and shapes, not listed
  text "Layer" at 1772.74,528 h60
  text "Name" at 2182.65,528 h60
  text "Material" at 3112.4,528 h60
  text "Thickness" at 3972.16,528 h60
  text "Constant" at 4622,528 h60
  text "Board Layer Stack" at 5191.86,528 h60
  text "Top Overlay" at 2182.65,408 h60
  text "Top Solder" at 2182.65,288 h60
  text "Solder Resist" at 3112.4,288 h60
  text "0.39mil" at 3972.16,288 h60
  text "3.5" at 4622,288 h60
  text "1" at 1772.74,168 h60
  text "Top Layer" at 2182.65,168 h60
  text "1.38mil" at 3972.16,168 h60
  text "Dielectric 2" at 2182.65,48 h60
  text "PP-006" at 3112.4,48 h60
  text "8.28mil" at 3972.16,48 h60
  text "4.4" at 4622,48 h60
  text "2" at 1772.74,-72 h60
  text "GND/Signal" at 2182.65,-72 h60
  text "CF-004" at 3112.4,-72 h60
  text "0.60mil" at 3972.16,-72 h60
  text "Dielectric 1" at 2182.65,-192 h60
  text "FR-4" at 3112.4,-192 h60
  text "41.93mil" at 3972.16,-192 h60
  text "4.6" at 4622,-192 h60
  text "3" at 1772.74,-312 h60
  text "PWR/Signal" at 2182.65,-312 h60
  text "CF-004" at 3112.4,-312 h60
  text "0.60mil" at 3972.16,-312 h60
  text "Dielectric 3" at 2182.65,-432 h60
  text "PP-006" at 3112.4,-432 h60
  text "8.28mil" at 3972.16,-432 h60
  text "4.4" at 4622,-432 h60
  text "4" at 1772.74,-552 h60
  text "Bottom Layer" at 2182.65,-552 h60
  text "1.38mil" at 3972.16,-552 h60
  text "Bottom Solder" at 2182.65,-672 h60
  text "Solder Resist" at 3112.4,-672 h60
  text "0.39mil" at 3972.16,-672 h60
  text "3.5" at 4622,-672 h60
  text "Bottom Overlay" at 2182.65,-792 h60
  text "Total board thickness:" at 1772.74,-912 h60
  text "63.24mil" at 3972.16,-912 h60
Drill Drawing:
  circle w10: c1781.12,1057.33 r33.33
  lines w10: 1747.79,1174 1814.46,1174 1814.46,1240.67 1747.79,1240.67 1747.79,1174 ; 1747.79,1390.67 1814.46,1390.67 1781.12,1324 1747.79,1390.67
  lines w15: 1688,979 14432.45,979 ; 1688,1429 14432.45,1429 ; 2238.88,829 2238.88,1579 ; 2818.72,829 2818.72,1579 ; 3918.4,829 3918.4,1579 ; 4424.28,829 4424.28,1579 ; 5158.08,829 5158.08,1579 ; 6657.63,829 6657.63,1579 ; 7247.48,829 7247.48,1579 ; 7993.28,829 7993.28,1579 ; 8643.11,829 8643.11,1579 ; 9496.87,829 9496.87,1579 ; 10830.48,829 10830.48,1579 ; 12164.09,829 12164.09,1579 ; 13029.85,829 13029.85,1579 ; 1688,829 14432.45,829 14432.45,1579 1688,1579 1688,829
  text "Symbol" at 1778,1474 h72
  text "Count" at 2283.88,1474 h72
  text "Hole Size" at 2863.72,1474 h72
  text "Plated" at 3963.4,1474 h72
  text "Hole Type" at 4469.28,1474 h72
  text "Drill Layer Pair" at 5203.08,1474 h72
  text "Via/Pad" at 6702.63,1474 h72
  text "Pad Shape" at 7292.48,1474 h72
  text "Template" at 8038.28,1474 h72
  text "Description" at 8688.11,1474 h72
  text "Hole Tolerance (+)" at 9541.87,1474 h72
  text "Hole Tolerance (-)" at 10875.48,1474 h72
  text "Hole Length" at 12209.09,1474 h72
  text "Routed Path Length" at 13074.85,1474 h72
  text "2" at 2283.88,1324 h60
  text "35.43mil (0.900mm)" at 2863.72,1324 h60
  text "PTH" at 3963.4,1324 h60
  text "Round" at 4469.28,1324 h60
  text "Top Layer - Bottom Layer" at 5203.08,1324 h60
  text "Pad" at 6702.63,1324 h60
  text "(Mixed)" at 7292.48,1324 h60
  text "(Mixed)" at 8038.28,1324 h60
  text "-" at 12209.09,1324 h60
  text "-" at 13074.85,1324 h60
  text "2" at 2283.88,1174 h60
  text "78.74mil (2.000mm)" at 2863.72,1174 h60
  text "NPTH" at 3963.4,1174 h60
  text "Round" at 4469.28,1174 h60
  text "Top Layer - Bottom Layer" at 5203.08,1174 h60
  text "Pad" at 6702.63,1174 h60
  text "Rounded" at 7292.48,1174 h60
  text "c200hn200" at 8038.28,1174 h60
  text "-" at 12209.09,1174 h60
  text "-" at 13074.85,1174 h60
  text "157" at 2283.88,1024 h60
  text "11.81mil (0.300mm)" at 2863.72,1024 h60
  text "PTH" at 3963.4,1024 h60
  text "Round" at 4469.28,1024 h60
  text "Top Layer - Bottom Layer" at 5203.08,1024 h60
  text "Via" at 6702.63,1024 h60
  text "Rounded" at 7292.48,1024 h60
  text "(Mixed)" at 8038.28,1024 h60
  text "-" at 12209.09,1024 h60
  text "-" at 13074.85,1024 h60
  text "161 Total" at 2283.88,874 h60

## Dimensions
-78.74,1039.26 to -78.74,-78.74 on Board Outline
-78.74,1039.26 to 1471.39,1039.26 on Board Outline